# Altium PCB PCB1.pcbdoc
Units mil, origin at the board's own origin, x right, y up, seen from the top; angles counter-clockwise.
Board outline 22891.3 x 3415.4 mil, 2 copper layers (Top Layer, Bottom Layer), stack 62.2 mil thick; 237 components, 120 nets, 553 pads, 0 vias.
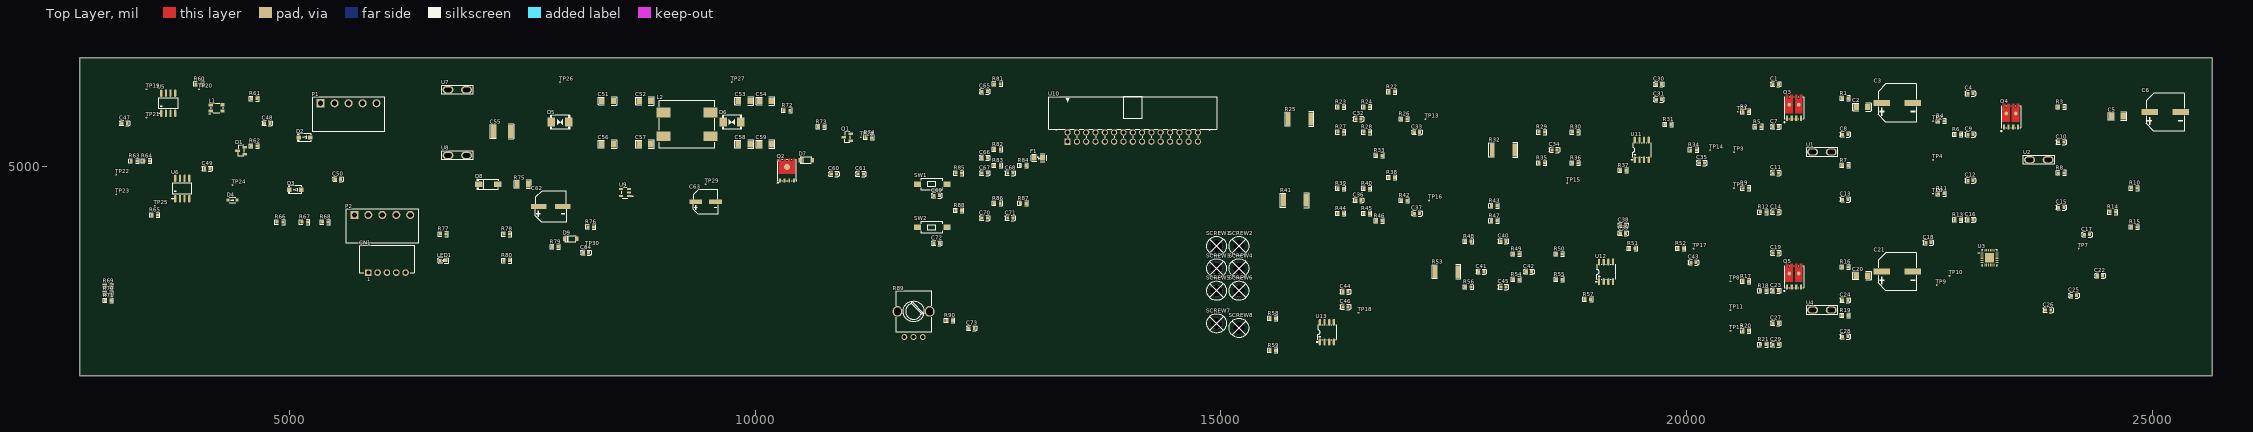
[diagram p0: Top Layer view]
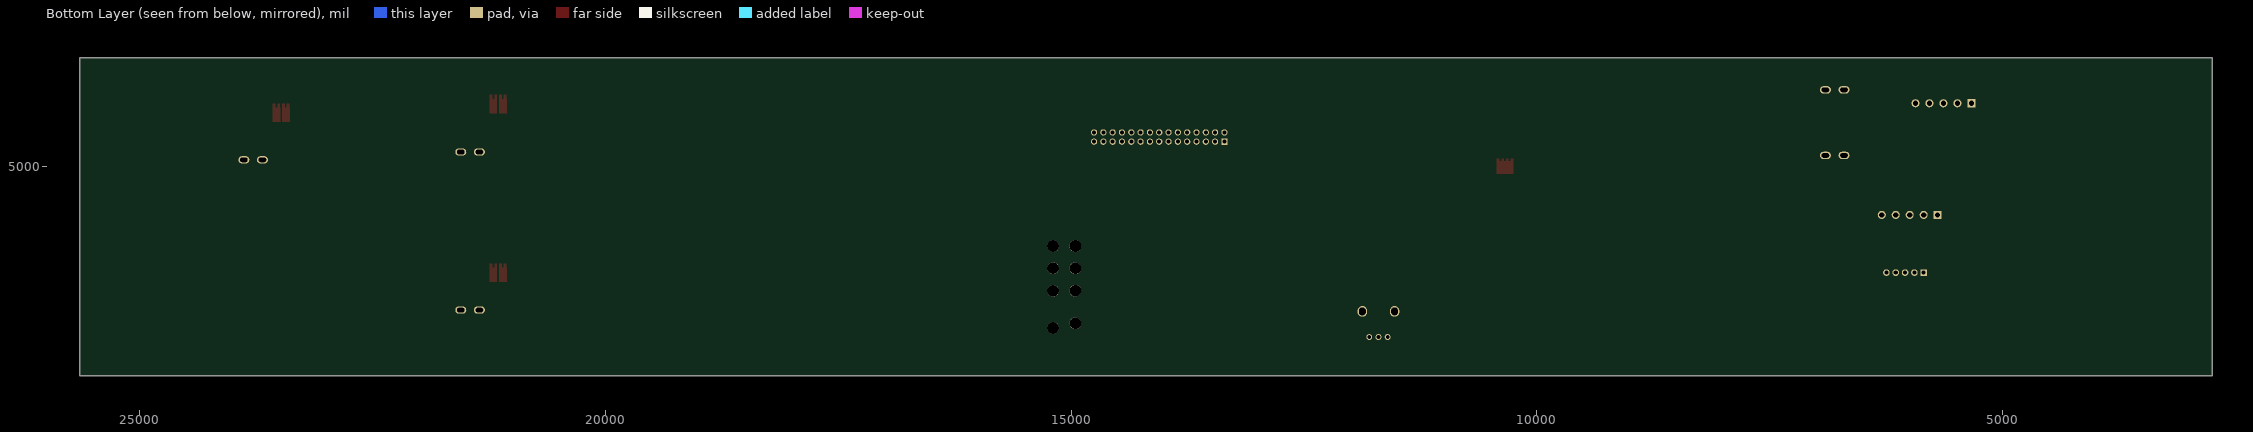
[diagram p1: Bottom Layer view, seen from below]

## Layer stack, top to bottom
Top Solder Mask Layer: solder mask 0.4, Dk 3.3
Top Layer: signal copper 1.4
Dielectric1: surface 59.4, FR4, Dk 4.5
Bottom Layer: signal copper 1.4
Bottom Solder Mask Layer: solder mask 0.4, Dk 3.3

## Board outline
25641.3,2750 2750,2750 2750,6165.4 25641.3,6165.4

## Design rules (kind name [scope] priority, off if disabled: settings)
BoardOutlineClearance copperThickness1oz [All] p0: genericclearance=10 ignorepadtopadclearanceinfootprint=FALSE except(0: Arc-SplitContinuation Track-SplitContinuation SMDPad-SplitContinuation THPad-SplitContinuation Via-SplitContinuation Fill-SplitContinuation Poly-SplitContinuation Region-SplitContinuation Text-SplitContinuation)
BoardOutlineClearance copperThickness2oz [All] p0: genericclearance=10 ignorepadtopadclearanceinfootprint=FALSE except(0: Arc-SplitContinuation Track-SplitContinuation SMDPad-SplitContinuation THPad-SplitContinuation Via-SplitContinuation Fill-SplitContinuation Poly-SplitContinuation Region-SplitContinuation Text-SplitContinuation)
BoardOutlineClearance otherClearance [All] p0: genericclearance=10 ignorepadtopadclearanceinfootprint=FALSE except(0: Arc-SplitContinuation Track-SplitContinuation SMDPad-SplitContinuation THPad-SplitContinuation Via-SplitContinuation Fill-SplitContinuation Poly-SplitContinuation Region-SplitContinuation Text-SplitContinuation)
Clearance copperThickness1oz [All] p1: gap=7 ignorepadtopadclearanceinfootprint=FALSE
Clearance copperThickness2oz [All] p1: gap=7 ignorepadtopadclearanceinfootprint=FALSE
Clearance otherClearance [All] p1: gap=7 ignorepadtopadclearanceinfootprint=FALSE
DiffPairsRouting differentialPair [All] p1: maxuncoupledlength=10 minlimit=6 maxlimit=Infinity mostfreqgap=6 toplayer_minwidth=5 toplayer_prefwidth=10 toplayer_maxwidth=100 bottomlayer_minwidth=5 bottomlayer_prefwidth=10 bottomlayer_maxwidth=100
PasteMaskExpansion pasteMaskExpansion [All] p1: expansion=0
PlaneConnect innerPlane [All] p1: planeconnectstyle=Relief reliefexpansion=20 reliefentries=4 reliefconductorwidth=10 reliefairgap=10
PolygonConnect copperRegion [All] p1: connectstyle=Relief reliefentries=4 reliefconductorwidth=10 polygonreliefangle="90 Angle" airgapwidth=10
RoutingVias viaSize [All] p1: viastyle="Through Hole" holewidth=12.0078 minholewidth=11.811 maxholewidth=248.0314 width=12.0078 minwidth=11.811 maxwidth=248.0314
SolderMaskExpansion solderMaskExpansion [IsVia] p1: useseparateexpansions=TRUE expansion=-1000 expansionbottom=-1000
SolderMaskExpansion solderMaskExpansion [All] p2: useseparateexpansions=TRUE expansion=2 expansionbottom=2
Width copperThickness1oz [All] p1: maxlimit=100 minlimit=5 preferedwidth=10
Width copperThickness2oz [All] p1: maxlimit=100 minlimit=8 preferedwidth=10

## Components (designator, comment, footprint, x,y, rotation, side; value= is the part's Value field where it differs from the comment)
C1 "100nF" C0603#1 20957.4,5882.2 r0 top
C2 "100nF" C1206 21883.5,5637.5 r0 top
C3 "220uF" CAP-SMD_BD10.0-L10.3-W10.3-LS11.7-FD#1 22261.1,5682.2 r0 top
C4 "100nF" C0603#2 23046.1,5782.2 r0 top
C5 "100nF" C1206 24625,5537.5 r0 top
C6 "220uF" CAP-SMD_BD10.0-L10.3-W10.3-LS11.7-FD#2 25137.3,5582.2 r0 top
C7 "100nF" C0603#1 20957.4,5424.8 r0 top
C8 "100nF" C0603#2 21702.4,5343 r0 top
C9 "100nF" C0603#2 23046.1,5343 r0 top
C10 "100nF" C0603#3 24020.9,5261.1 r0 top
C11 "100nF" C0603#1 20957.4,4930.1 r0 top
C12 "100nF" C0603#2 23046.1,4848.3 r0 top
C13 "100nF" C0603#2 21702.4,4645.4 r0 top
C14 "100nF" C0603#1 20957.4,4509.6 r0 top
C15 "100nF" C0603#3 24020.9,4559.6 r0 top
C16 "100nF" C0603#2 23046.1,4427.7 r0 top
C17 "100nF" C0603#2 24298.4,4268.2 r0 top
C18 "100nF" C0603#3 22595,4182.4 r0 top
C19 "100nF" C0603#1 20957.4,4069.9 r0 top
C20 "100nF" C1206 21883.5,3825.2 r0 top
C21 "220uF" CAP-SMD_BD10.0-L10.3-W10.3-LS11.7-FD#1 22261.1,3869.9 r0 top
C22 "100nF" C0603#1 24438.1,3825.2 r0 top
C23 "100nF" C0603#1 20957.4,3664.6 r0 top
C24 "100nF" C0603#2 21702.4,3564.6 r0 top
C25 "100nF" C0603#1 24158.5,3614.6 r0 top
C26 "100nF" C0603#1 23881.2,3457.7 r0 top
C27 "100nF" C0603#1 20957.4,3317.3 r0 top
C28 "100nF" C0603#2 21702.4,3173 r0 top
C29 "100nF" C0603#1 20957.4,3087.2 r0 top
C30 "100nF" C0603#2 19701.4,5882.2 r0 top
C31 "100nF" C0603#2 19701.4,5718.7 r0 top
C32 "100nF" C0603#1 16477.3,5508.4 r0 top
C33 "100nF" C0603#2 17106.2,5368 r0 top
C34 "100nF" C0603#2 18581.4,5177 r0 top
C35 "100nF" C0603#3 20163.5,5036.6 r0 top
C36 "100nF" C0603#1 16477.3,4635.4 r0 top
C37 "100nF" C0603#2 17106.2,4495 r0 top
C38 "100nF" C0603#3 19317.9,4367.3 r0 top
C39 "100nF" C0603#3 19317.9,4281.5 r0 top
C40 "100nF" C0603#2 18032.4,4195.7 r0 top
C41 "100nF" C0603#1 17795,3868.4 r0 top
C42 "100nF" C0603#2 18306.9,3868.4 r0 top
C43 "100nF" C0603#2 20073.7,3968.4 r0 top
C44 "100nF" C0603#2 16337.6,3654.9 r0 top
C45 "100nF" C0603#2 18032.4,3704.9 r0 top
C46 "100nF" C0603#2 16337.6,3491.4 r0 top
C47 "100nF" C0603#2 3231.5,5462.7 r0 top
C48 "100nF" C0603#3 4761.6,5462.7 r0 top
C49 "100nF" C0603#3 4118.5,4975.9 r0 top
C50 "100nF" C0603#2 5522.3,4863.4 r0 top
C51 "100nF" C1206 8416.2,5701.9 r0 top
C52 "100nF" C1206 8817.4,5701.9 r0 top
C53 "100nF" C1206 9882.3,5701.9 r0 top
C54 "100nF" C1206 10109.8,5701.9 r0 top
C55 "100uF" C1812 7283.6,5375.2 r0 top
C56 "100nF" C1206 8416.2,5237.9 r0 top
C57 "100nF" C1206 8817.4,5237.9 r0 top
C58 "100nF" C1206 9882.3,5237.9 r0 top
C59 "100nF" C1206 10109.8,5237.9 r0 top
C60 "100nF" C0603#2 10845.4,4918 r0 top
C61 "100nF" C0603#3 11134.1,4918 r0 top
C62 "220uF" CAP-SMD_BD8.0-L8.3-W8.3-FD 7804.8,4569 r0 top
C63 "220uF" CAP-SMD_BD6.3-L6.6-W6.6-LS7.3-FD-H7.7 9467.9,4619 r0 top
C64 "100nF" C0603#3 8185,4074 r0 top
C65 "100nF" C0603#3 12464.2,5804.5 r0 top
C66 "100nF" C0603#3 12464.2,5091.6 r0 top
C67 "100nF" C0603#3 12464.2,4928.1 r0 top
C68 "100nF" C0603#3 12738.7,4928.1 r0 top
C69 "100nF" C0603#2 11950,4686.6 r0 top
C70 "100nF" C0603#3 12464.2,4445.4 r0 top
C71 "100nF" C0603#3 12738.7,4445.4 r0 top
C72 "100nF" C0603#2 11950,4175 r0 top
C73 "100nF" C0603#2 12324.5,3263.8 r0 top
CN1 "XH-5AW" CONN-TH_5P-P2.54_XH-5AW_C2908614 6046.8,3859.9 r0 top
D1 "PESD2CAN" SOT-23-3_L2.9-W1.3-P1.90-LS2.4-BR#1 4481.5,5169.5 r0 top
D2 "1N4007 A7" SOD-123FL_L2.8-W1.8-LS3.7-RD 5162.4,5310.6 r0 top
D3 "1N4007 A7" SOD-123FL_L2.8-W1.8-LS3.7-RD 5062.4,4750.9 r0 top
D4 "PESD1LIN" SOD-323_L1.7-W1.3-LS2.5-BI 4388,4638.2 r0 top
D5 "SMBJ40CA" SMB_L4.6-W3.6-LS5.3-BI#1 7904.8,5475.2 r0 top
D6 "SMBJ40CA" SMB_L4.6-W3.6-LS5.3-BI#2 9748.9,5475.2 r0 top
D7 "BZT52C5V1" SOD-123_L2.7-W1.6-LS3.7-RD 10548.3,5068 r0 top
D8 "ES1J" SMA_L4.4-W2.8-LS5.4-RD 7133.6,4808.6 r0 top
D9 "BAT46W-HE3-08" SOD-123_L2.8-W1.8-LS3.7-RD 8019.7,4223.3 r0 top
F1 "SMD0805-050-6" F0805 13040.9,5091.6 r0 top
L1 "PSCIAQ3225-510Z" FILTER-SMD_4P-L3.2-W2.5-BL_SDCW3225L-2-601TF 4218.5,5627.9 r0 top
L2 "PCAQ1513MW-301" FILTER-SMD_4P-L15.0-W13.0-BL-1 9267.9,5451.9 r0 top
LED1 "" LED_0603 6652.3,3988.9 r0 top
P1 "WJ15EDGRC-3.81-5P" CONN-TH_5P-P3.81_WJ15EDGRC-3.81-5P 5634.7,5677.9 r0 top
P2 "WJ15EDGRC-3.81-5P" CONN-TH_5P-P3.81_WJ15EDGRC-3.81-5P 5996.8,4479.1 r0 top
Q1 "BC847B,215" SOT-23-3_L2.9-W1.3-P1.90-LS2.4-BR#2 10988.8,5313.4 r0 top
Q2 "JMSH0401AGQ" POWERVDFN-8_L6.2-W5.2-P1.27-LS6.0-BL 10341.3,4918 r0 top
Q3 "YJGD20G10B" DFN-8_L5.5-W5.2-P1.27-LS6.0-BL-EP2#1 21152,5582.2 r0 top
Q4 "YJGD20G10B" DFN-8_L5.5-W5.2-P1.27-LS6.0-BL-EP2#1 23481.2,5487.5 r0 top
Q5 "YJGD20G10B" DFN-8_L5.5-W5.2-P1.27-LS6.0-BL-EP2#2 21152,3769.9 r0 top
R1 "10K" R0603#1 21702.4,5732.2 r0 top
R2 "10K" R0603#2 20635.1,5587.5 r0 top
R3 "10K" R0603#3 24020.9,5637.5 r0 top
R4 "10K" R0603#2 22734.4,5487.5 r0 top
R5 "10K" R0603#1 20769.9,5424.8 r0 top
R6 "10K" R0603#3 22908.5,5343 r0 top
R7 "10K" R0603#1 21702.4,5012 r0 top
R8 "10K" R0603#3 24020.9,4930.1 r0 top
R9 "10K" R0603#2 20635.1,4766.6 r0 top
R10 "10K" R0603#1 24806.2,4766.6 r0 top
R11 "10K" R0603#2 22734.4,4708.1 r0 top
R12 "10K" R0603#1 20819.9,4509.6 r0 top
R13 "10K" R0603#3 22908.5,4427.7 r0 top
R14 "10K" R0603#3 24575,4509.6 r0 top
R15 "KNTC0603/10KF3950" R0603#1 24806.2,4350 r0 top
R16 "10K" R0603#1 21702.4,3919.9 r0 top
R17 "10K" R0603#2 20635.1,3766.6 r0 top
R18 "10K" R0603#1 20819.9,3664.6 r0 top
R19 "10K" R0603#1 21702.4,3399.2 r0 top
R20 "10K" R0603#2 20635.1,3235.7 r0 top
R21 "10K" R0603#1 20819.9,3087.2 r0 top
R22 "10K" R0603#1 16833.9,5800.6 r0 top
R23 "10K" R0603#1 16287.6,5637.1 r0 top
R24 "10K" R0603#1 16564.4,5637.1 r0 top
R25 "10mΩ" R2512 15842.9,5508.4 r0 top
R26 "10K" R0603#2 16968.6,5508.4 r0 top
R27 "10K" R0603#1 16287.6,5368 r0 top
R28 "10K" R0603#1 16564.4,5368 r0 top
R29 "10K" R0603#3 18443.8,5368 r0 top
R30 "10K" R0603#1 18805.5,5368 r0 top
R31 "10K" R0603#1 19801.4,5449.8 r0 top
R32 "10mΩ" R2512 18032.4,5177 r0 top
R33 "10K" R0603#3 16699.1,5118.4 r0 top
R34 "10K" R0603#1 20073.7,5177 r0 top
R35 "10K" R0603#3 18443.8,5036.6 r0 top
R36 "10K" R0603#1 18805.5,5036.6 r0 top
R37 "10K" R0603#3 19317.9,4958.9 r0 top
R38 "10K" R0603#1 16833.9,4881.2 r0 top
R39 "10K" R0603#1 16287.6,4764.1 r0 top
R40 "10K" R0603#1 16564.4,4764.1 r0 top
R41 "10mΩ" R2512 15792.9,4635.4 r0 top
R42 "10K" R0603#2 16968.6,4635.4 r0 top
R43 "10K" R0603#1 17932.4,4576.8 r0 top
R44 "10K" R0603#1 16287.6,4495 r0 top
R45 "10K" R0603#1 16564.4,4495 r0 top
R46 "10K" R0603#3 16699.1,4417.3 r0 top
R47 "10K" R0603#1 17932.4,4417.3 r0 top
R48 "10K" R0603#1 17657.5,4195.7 r0 top
R49 "10K" R0603#3 18169.3,4059.4 r0 top
R50 "10K" R0603#1 18631.4,4059.4 r0 top
R51 "10K" R0603#3 19417.9,4118 r0 top
R52 "10K" R0603#2 19936.1,4118 r0 top
R53 "10mΩ" R2512 17422.3,3868.4 r0 top
R54 "10K" R0603#3 18169.3,3786.8 r0 top
R55 "10K" R0603#1 18631.4,3786.8 r0 top
R56 "10K" R0603#1 17657.5,3704.9 r0 top
R57 "10K" R0603#3 18940.2,3573.3 r0 top
R58 "10K" R0603#2 15557.7,3370.4 r0 top
R59 "10K" R0603#2 15557.7,3026 r0 top
R60 "10K" R0603#1 4028.7,5886.4 r0 top
R61 "10K" R0603#2 4624.1,5727.9 r0 top
R62 "10K" R0603#2 4624.1,5219.5 r0 top
R63 "10K" R0603#1 3331.5,5057.7 r0 top
R64 "10K" R0603#2 3466.2,5057.7 r0 top
R65 "10K" R0603#1 3553.3,4479.1 r0 top
R66 "10K" R0603#1 4898.6,4401.4 r0 top
R67 "10K" R0603#3 5162.4,4401.4 r0 top
R68 "10K" R0603#3 5384.7,4401.4 r0 top
R69 "10K" R0603#3 3054.5,3716.2 r0 top
R70 "10K" R0603#3 3054.5,3638.5 r0 top
R71 "10K" R0603#3 3054.5,3560.8 r0 top
R72 "10K" R0603#3 10341.3,5601.9 r0 top
R73 "10K" R0603#3 10707.8,5425.2 r0 top
R74 "10K" R0603#2 11221.2,5313.4 r0 top
R75 "10K" R1206 7504.8,4808.6 r0 top
R76 "10K" R0603#3 8235,4351 r0 top
R77 "10K" R0603#2 6652.3,4273.3 r0 top
R78 "10K" R0603#3 7333.6,4273.3 r0 top
R79 "10K" R0603#3 7854.8,4136.7 r0 top
R80 "10K" R0603#3 7333.6,3988.9 r0 top
R81 "10K" R0603#1 12601.2,5886.4 r0 top
R82 "10K" R0603#1 12601.2,5183.3 r0 top
R83 "10K" R0603#1 12601.2,5009.9 r0 top
R84 "10K" R0603#1 12875.7,5009.9 r0 top
R85 "10K" R0603#3 12186.9,4928.1 r0 top
R86 "10K" R0603#1 12601.2,4604.9 r0 top
R87 "10K" R0603#1 12875.7,4604.9 r0 top
R88 "10K" R0603#3 12186.9,4527.2 r0 top
R89 "R09022N0-FB20B7.0-B503-000" RES-ADJ-TH_R09022N0-FB20B7B503-0004 11700,3305.7 r0 top
R90 "10K" R0603#3 12086.9,3345.7 r0 top
SCREW1 "" M3螺丝 14953.6,4145 r0 top
SCREW2 "" M3螺丝 15193.3,4145 r0 top
SCREW3 "" M3螺丝 14953.6,3905.4 r0 top
SCREW4 "" M3螺丝 15193.3,3905.4 r0 top
SCREW5 "" M3螺丝 14953.6,3665.7 r0 top
SCREW6 "" M3螺丝 15193.3,3665.7 r0 top
SCREW7 "" M3螺丝 14953.6,3315.7 r0 top
SCREW8 "" M3螺丝 15193.3,3265.7 r0 top
SW1 "TS-1101-C-W" SW-SMD_L6.0-W3.3-LS8.0 11900,4810.1 r0 top
SW2 "TS-1101-C-W" SW-SMD_L6.0-W3.3-LS8.0 11900,4345.4 r0 top
TP1 "" Test-Point-0.5mm 20548.1,5587.5 r0 top
TP2 "" Test-Point-0.5mm 22645,5487.5 r0 top
TP3 "" Test-Point-0.5mm 20508.7,5154.3 r0 top
TP4 "" Test-Point-0.5mm 22645,5070.5 r0 top
TP5 "" Test-Point-0.5mm 20508.7,4766.6 r0 top
TP6 "" Test-Point-0.5mm 22645,4708.1 r0 top
TP7 "" Test-Point-0.5mm 24208.5,4119.9 r0 top
TP8 "" Test-Point-0.5mm 20469.3,3766.6 r0 top
TP9 "" Test-Point-0.5mm 22684.4,3727.3 r0 top
TP10 "" Test-Point-0.5mm 22821.5,3825.2 r0 top
TP11 "" Test-Point-0.5mm 20469.3,3457.7 r0 top
TP12 "" Test-Point-0.5mm 20469.3,3235.7 r0 top
TP13 "" Test-Point-0.5mm 17195.4,5508.4 r0 top
TP14 "" Test-Point-0.5mm 20252.8,5177 r0 top
TP15 "" Test-Point-0.5mm 18718.4,4822.6 r0 top
TP16 "" Test-Point-0.5mm 17234.8,4635.4 r0 top
TP17 "" Test-Point-0.5mm 20073.7,4118 r0 top
TP18 "" Test-Point-0.5mm 16477.3,3428.9 r0 top
TP19 "" Test-Point-0.5mm 3466.2,5827.9 r0 top
TP20 "" Test-Point-0.5mm 4028.7,5827.9 r0 top
TP21 "" Test-Point-0.5mm 3466.2,5525.4 r0 top
TP22 "" Test-Point-0.5mm 3141.6,4913.4 r0 top
TP23 "" Test-Point-0.5mm 3141.6,4700.9 r0 top
TP24 "" Test-Point-0.5mm 4388,4800.9 r0 top
TP25 "" Test-Point-0.5mm 3553.3,4576.7 r0 top
TP26 "" Test-Point-0.5mm 7904.8,5905.6 r0 top
TP27 "" Test-Point-0.5mm 9748.9,5905.6 r0 top
TP28 "" Test-Point-0.5mm 11134.1,5313.4 r0 top
TP29 "" Test-Point-0.5mm 9467.9,4808.6 r0 top
TP30 "" Test-Point-0.5mm 8185,4136.7 r0 top
U1 "EST026" CONN-TH_L6.3-W0.8-EST026 21452,5154.3 r0 top
U2 "EST026" CONN-TH_L6.3-W0.8-EST026 23781.2,5070.5 r0 top
U3 "" QFN24_L4.0-W4.0-P0.5-TL-EP2.45 23250.3,4019.9 r0 top
U4 "EST026" CONN-TH_L6.3-W0.8-EST026 21452,3457.7 r0 top
U5 "TJA1044GTJ" SOIC-8_L4.9-W3.9-P1.27-LS6.0-BL 3699,5677.9 r0 top
U6 "TJA1021T/20/CM,118" SOIC-8_L4.9-W3.9-P1.27-LS6.0-BL 3849,4763.4 r0 top
U7 "EST026" CONN-TH_L6.3-W0.8-EST026 6802.3,5821.8 r0 top
U8 "EST026" CONN-TH_L6.3-W0.8-EST026 6802.3,5118 r0 top
U9 "ICW1235C50M5GQ1" SOT-23-5_L2.9-W1.6-P0.95-LS2.8-BR 8602.8,4719 r0 top
U10 "XDFH-0259-2*15P" CONN-TH_30P-P2.54_LX_XDFH-0259-2X15P 14053.6,5315.4 r0 top
U11 "TP2412-SR" SOP-8_L4.9-W3.9-P1.27-LS6.0-BL 19517.9,5177 r0 top
U12 "TP2412-SR" SOP-8_L4.9-W3.9-P1.27-LS6.0-BL 19134.5,3868.4 r0 top
U13 "TP2412-SR" SOP-8_L4.9-W3.9-P1.27-LS6.0-BL 16137.6,3220.4 r0 top

## Footprints (in the part's own frame and the unit in brackets; to place one, negate y for a bottom-side part, rotate by r counter-clockwise, add the part's x,y. Pads: shape width x height; smd on the part's side, far side on the other; paste and mask are expansions set on the pad)
C0603#1 [mil]
  rect 31.5x35.4 smd: 1(-27.6,0) 2(27.6,0)
  silkscreen extent -55,-28 55,28
C0603#2 [mil]
  rect 31.5x35.4 smd: 1(-27.6,0) 2(27.5,0)
  silkscreen extent -55,-28 55,28
C0603#3 [mil]
  rect 31.5x35.4 smd: 1(-27.5,0) 2(27.6,0)
  silkscreen extent -55,-28 55,28
C1206 [mil]
  rect 58.5x68 smd paste-3937 mask+2: 1(-62.7,0) 2(62.7,0)
  silkscreen extent -101,-43 101,43
C1812 [mil]
  rect 58.5x136.1 smd paste-3937 mask+2: 1(-90.2,0) 2(90.3,0)
  silkscreen extent -128,-77 128,77
CAP-SMD_BD6.3-L6.6-W6.6-LS7.3-FD-H7.7 [mil]
  rect 137.8x47.2 smd: 1(-105.2,0) 2(105.1,0)
  silkscreen extent -133,-133 133,133
CAP-SMD_BD8.0-L8.3-W8.3-FD [mil]
  rect 165.4x55.1 smd: 1(-128.6,0) 2(128.7,0)
  silkscreen extent -165,-166 165,166
CAP-SMD_BD10.0-L10.3-W10.3-LS11.7-FD#1 [mil]
  rect 177.2x65 smd: 1(-165.4,0) 2(165.3,0)
  silkscreen extent -206,-206 206,206
CAP-SMD_BD10.0-L10.3-W10.3-LS11.7-FD#2 [mil]
  rect 177.2x65 smd: 1(-165.3,0) 2(165.4,0)
  silkscreen extent -206,-206 206,206
CONN-TH_5P-P2.54_XH-5AW_C2908614 [mil]
  rect 70.9x70.9 hole 43.3 paste+0 mask+2: 1(-200,0)
  round 70.9 hole 43.3 paste+0 mask+2: 2(-100,0) 3(0,0) 4(100,0) 5(200,0)
  silkscreen extent -295,0 295,291
CONN-TH_5P-P3.81_WJ15EDGRC-3.81-5P [mil]
  rect 86.6x86.6 hole 55.1: 1(-300,0)
  round 86.6 hole 55.1: 2(-150,0) 3(0,0) 4(150,0) 5(300,0)
  silkscreen extent -390,-300 390,63
CONN-TH_30P-P2.54_LX_XDFH-0259-2X15P [mil]
  rect 66.9x66.9 hole 43.3: 1(-700,-50)
  round 66.9 hole 43.3: 2(-700,50) 3(-600,-50) 4(-600,50) 5(-500,-50) 6(-500,50) 7(-400,-50) 8(-400,50) 9(-300,-50) 10(-300,50) 11(-200,-50) 12(-200,50) 13(-100,-50) 14(-100,50) 15(0,-50) 16(0,50) 17(100,-50) 18(100,50) 19(200,-50) 20(200,50) 21(300,-50) 22(300,50) 23(400,-50) 24(400,50) 25(500,-50) 26(500,50) 27(600,-50) 28(600,50) 29(700,-50) 30(700,50)
  silkscreen extent -900,-7 900,432
CONN-TH_L6.3-W0.8-EST026 [mil]
  oval 118.1x78.7 hole 47.2 slot 78.7 at 0 deg: 1(-100,0) 2(100,0)
  silkscreen extent -165,-49 165,49
DFN-8_L5.5-W5.2-P1.27-LS6.0-BL-EP2#1 [mil]
  rect 24x55 smd: 1(-75,-65.3) 2(-25,-65.3) 3(25,-65.3) 4(75,-65.3)
  round 39.8 smd: 5(51,80.2)
  round 39.7 smd: 6(-51,80.6)
  Top Layer region: 11.2,-10.1 11.2,140.9 12.8,140.9 12.8,184.9 37.3,184.9 37.3,140.9 62.9,140.9 62.9,184.9 87.5,184.9 87.5,140.9 91.1,140.9 91.1,-10.1
  Top Layer region: -91.1,-10.1 -91.1,140.9 -87.6,140.9 -87.6,184.9 -62.5,184.9 -62.5,140.9 -37.9,140.9 -37.9,184.9 -12.3,184.9 -12.3,140.9 -11.3,140.9 -11.3,-10.1
  silkscreen extent -107,-113 105,164
DFN-8_L5.5-W5.2-P1.27-LS6.0-BL-EP2#2 [mil]
  rect 24x55 smd: 1(-75,-65.4) 2(-25,-65.4) 3(25,-65.4) 4(75,-65.4)
  round 39.8 smd: 5(51,80.2)
  round 39.7 smd: 6(-51,80.6)
  Top Layer region: 11.2,-10.1 11.2,140.8 12.8,140.8 12.8,184.9 37.3,184.9 37.3,140.8 62.9,140.8 62.9,184.9 87.5,184.9 87.5,140.8 91.1,140.8 91.1,-10.1
  Top Layer region: -91.1,-10.1 -91.1,140.8 -87.6,140.8 -87.6,184.9 -62.5,184.9 -62.5,140.8 -37.9,140.8 -37.9,184.9 -12.3,184.9 -12.3,140.8 -11.3,140.8 -11.3,-10.1
  silkscreen extent -107,-113 105,164
F0805 [mil]
  rect 52.6x59.1 smd paste-3937 mask+2: 1(-45,0) 2(44.9,0)
  silkscreen extent -85,-40 85,40
FILTER-SMD_4P-L3.2-W2.5-BL_SDCW3225L-2-601TF [mil]
  rect 47.2x35.4 smd: 1(-63,-33.5) 2(63,-33.5) 3(63,33.4) 4(-63,33.4)
  silkscreen extent -80,-70 65,50
FILTER-SMD_4P-L15.0-W13.0-BL-1 [mil]
  rect 149.6x106.3 smd: 1(-252,128) 2(-252,-127.9) 3(251.9,-127.9) 4(251.9,128)
  silkscreen extent -295,-256 295,256
LED_0603 [mil]
  rect 31.5x31.5 smd paste+0 mask+2: 1(-33.5,-0.4) 2(29.5,-0.2)
  silkscreen extent -61,-30 53,30
M3螺丝 [mil]
  round 126 hole 126 paste+0 mask+4: 1(0,0)
  silkscreen extent -105,-105 105,105
POWERVDFN-8_L6.2-W5.2-P1.27-LS6.0-BL [mil]
  rect 19.7x39.4 smd paste-3937 mask+2: 1(-75,-69.9) 2(-25,-69.9) 3(25,-69.9) 4(75,-69.9)
  round 62.5 smd: 5(0,76.2)
  Top Layer region: -86.6,1 -86.6,162.4 -63,162.4 -63,138.8 -35.4,138.8 -35.4,162.4 -15.7,162.4 -15.7,138.8 15.8,138.8 15.8,162.4 35.5,162.4 35.5,138.8 63,138.8 63,162.4 86.7,162.4 86.7,1
  silkscreen extent -103,-99 100,151
QFN24_L4.0-W4.0-P0.5-TL-EP2.45 [mil]
  rect 32x10 smd paste+0 mask+2: 1(-80,49.2) 2(-80,29.5) 3(-80,9.8) 4(-80,-9.8) 5(-80,-29.5) 6(-80,-49.2) 13(80,-49.2) 14(80,-29.5) 15(80,-9.8) 16(80,9.8) 17(80,29.5) 18(80,49.2)
  rect 10x32 smd paste+0 mask+2: 7(-49.2,-80) 8(-29.5,-80) 9(-9.8,-80) 10(9.9,-80) 11(29.6,-80) 12(49.2,-80) 19(49.2,80) 20(29.6,80) 21(9.9,80) 22(-9.8,80) 23(-29.5,80) 24(-49.2,80)
  rect 100x100 smd paste+0 mask+2: 25(0,0)
  silkscreen extent -118,-85 85,85
R0603#1 [mil]
  rect 31.8x34 smd paste-3937 mask+2: 1(-29.7,0) 2(29.6,0)
  silkscreen extent -54,-26 54,26
R0603#2 [mil]
  rect 31.8x34 smd paste-3937 mask+2: 1(-29.7,0) 2(29.7,0)
  silkscreen extent -54,-26 54,26
R0603#3 [mil]
  rect 31.8x34 smd paste-3937 mask+2: 1(-29.6,0) 2(29.7,0)
  silkscreen extent -54,-26 55,26
R1206 [mil]
  rect 47.5x67 smd paste-3937 mask+2: 1(-58.2,0) 2(58.2,0)
  silkscreen extent -91,-42 91,42
R2512 [mil]
  rect 50.5x136.1 smd paste-3937 mask+2: 1(-120.7,0) 2(120.7,0)
  silkscreen extent -155,-77 155,77
RES-ADJ-TH_R09022N0-FB20B7B503-0004 [mil]
  round 63 hole 39.4: 1(-98.4,-137.8) 2(0,-137.8) 3(98.4,-137.8)
  oval 102.4x114.2 hole 70.9 slot 82.7 at 90 deg: 4(173.2,137.8) 5(-173.2,137.8)
  silkscreen extent -193,-79 193,354
SMA_L4.4-W2.8-LS5.4-RD [mil]
  rect 80.6x63.8 smd: 1(-101,0) 2(101,0)
  silkscreen extent -121,-57 106,57
SMB_L4.6-W3.6-LS5.3-BI#1 [mil]
  rect 80.6x94.5 smd: 1(-94.1,0) 2(94.2,0)
  silkscreen extent -105,-75 108,75
SMB_L4.6-W3.6-LS5.3-BI#2 [mil]
  rect 80.6x94.5 smd: 1(-94.2,0) 2(94.1,0)
  silkscreen extent -105,-75 108,75
SOD-123_L2.7-W1.6-LS3.7-RD [mil]
  rect 35.8x48 smd: 1(-64.4,0) 2(64.4,0)
  silkscreen extent -63,-40 54,40
SOD-123_L2.8-W1.8-LS3.7-RD [mil]
  rect 37.4x45.3 smd: 1(-66.6,0) 2(66.6,0)
  silkscreen extent -62,-34 55,34
SOD-123FL_L2.8-W1.8-LS3.7-RD [mil]
  rect 47.2x47.2 smd: 1(-63,0) 2(63,0)
  silkscreen extent -75,-39 71,39
SOD-323_L1.7-W1.3-LS2.5-BI [mil]
  rect 31.5x31.5 smd: 1(-47.4,0) 2(47.5,0)
  silkscreen extent -34,-27 33,28
SOIC-8_L4.9-W3.9-P1.27-LS6.0-BL [mil]
  oval 23.1x80.5 smd: 1(-75,-109.2) 2(-25,-109.2) 3(25,-109.2) 4(75,-109.2) 5(75,109.1) 6(25,109.1) 7(-25,109.1) 8(-75,109.1)
  silkscreen extent -110,-115 99,60
SOP-8_L4.9-W3.9-P1.27-LS6.0-BL [mil]
  oval 24.8x73.4 smd: 1(-75,-105.6) 2(-25,-105.6) 3(25,-105.6) 4(75,-105.6) 5(75,105.6) 6(25,105.6) 7(-25,105.6) 8(-75,105.6)
  silkscreen extent -111,-112 98,79
SOT-23-3_L2.9-W1.3-P1.90-LS2.4-BR#1 [mil]
  rect 49.2x27.6 smd: 1(39.4,-37.4) 2(39.4,37.4) 3(-39.3,0)
  silkscreen extent -29,-60 29,60
SOT-23-3_L2.9-W1.3-P1.90-LS2.4-BR#2 [mil]
  rect 49.2x27.6 smd: 1(39.3,-37.4) 2(39.3,37.4) 3(-39.4,0)
  silkscreen extent -29,-60 28,60
SOT-23-5_L2.9-W1.6-P0.95-LS2.8-BR [mil]
  rect 39.4x23.6 smd paste+0 mask+2: 1(43.3,-37.4) 2(43.3,0) 3(43.3,37.4) 4(-43.3,37.4) 5(-43.3,-37.4)
  silkscreen extent -35,-60 85,55
SW-SMD_L6.0-W3.3-LS8.0 [mil]
  rect 74.8x59.1 smd: 1(-157.5,0) 2(157.5,0)
  silkscreen extent -124,-66 113,64
Test-Point-0.5mm [mil]
  round 19.7 smd: 1(0,0)

## Nets (pads, with @x,y where several pads share a name; then routed paths per layer and width w, separated by ;. In a path a pad name is that pad's centre, name@x,y a point inside that pad or via, vN(x,y) a via of type N, cw(c..) or ccw(c..) an arc to the next point about the centre after c; other vN are vias at no path point)
2V5: R33.1 R37.1 R46.1 TP18.1 U13.1 U13.2
2V5_1: R57.1 TP15.1 U12.6 U12.7
5V: C30.2 C31.2 C38.2 C39.2 C44.2 C46.2 C47.2 C63.1 D3.2 D9.1 F1.1 R10.1 R43.2 R58.2 R63.1 R64.1 R65.2 R66.2 R67.2 R68.2 R85.2 R88.2 R89.1 TP29.1 U5.3 U9.5 U11.8 U12.8 U13.8
12V: C18.1 C62.1 R75.2 R76.2 U3.4 U9.1
$1N2750: C4.1 C9.2 Q4.2 R4.1 R6.2
$1N2751: C12.1 C16.2 Q4.4 R11.1 R13.2
$1N2760: C1.1 C7.2 Q3.2 R2.1 R5.2
$1N2761: C11.1 C14.2 Q3.4 R9.1 R12.2
$1N2770: C19.1 C23.2 Q5.2 R17.1 R18.2
$1N2771: C27.1 C29.2 Q5.4 R20.1 R21.2
$1N2783: C22.2 U3.20
$1N2785: C25.2 U3.17
$1N2787: C26.2 U3.14
$1N10342: R10.2 R14.1 R15.1
$1N10503: TP7.1 U3.21
$1N10524: TP10.1 U3.7
$1N10545: TP9.1 U3.8
$1N14018: C8.2 R1.2
$1N14105: C13.2 R7.2
$1N14245: C28.2 R19.2
$1N14252: C24.2 R16.2
$1N14389: C15.2 R8.2
$1N14396: C10.2 R3.2
$2N1757: R58.1 R59.2 U13.3
$2N1759: C32.1 R23.2 R24.1
$2N1760: C32.2 R27.2 R28.1
$2N1761: R28.2 R33.2 U13.5
$2N1762: R22.2 R24.2 U13.6
$2N1768: R22.1 R26.2 U13.7
$2N1769: C36.1 R39.2 R40.1
$2N1770: C36.2 R44.2 R45.1
$2N1775: R45.2 R46.2 U11.5
$2N1777: R38.2 R40.2 U11.6
$2N1778: C34.1 R29.2 R30.1
$2N1779: C34.2 R35.2 R36.1
$2N1784: R30.2 R31.2 U11.2
$2N1785: R36.2 R37.2 U11.3
$2N1787: C42.1 R49.2 R50.1
$2N1788: C42.2 R54.2 R55.1
$2N1789: C40.1 C41.2 R48.1 R49.1
$2N1791: C41.1 C45.1 R54.1 R56.1
$2N1793: R50.2 R51.2 U12.2
$2N1794: R55.2 R57.2 U12.3
$2N1796: R51.1 R52.2 U12.1
$2N1797: R38.1 R42.2 U11.7
$2N1800: R31.1 R34.2 U11.1
$2N8532: R43.1 R47.2 U12.5
$3N718: R60.2 TP20.1 U5.8
$3N719: C48.2 R61.2 R62.1
$3N723: L1.1 U5.7
$3N724: L1.4 U5.6
$3N728: R65.1 TP25.1 U6.2
$3N989: D2.1 P1.5
$3N6022: C50.1 CN1.5 D3.1 P2.1
$4N726: C51.1 C56.2
$4N727: C52.1 C57.2
$4N728: C54.1 C59.2
$4N733: C60.2 D7.1 Q2.4 R72.1 R73.2
$4N735: C61.2 Q1.1 R74.2 TP28.1
$4N736: Q1.3 R73.1
$4N923: R78.1 R79.2 R80.2
$4N2754: LED1.2 R77.2
$4N3161: D8.1 R75.1
$4N5208: R76.1 U9.3
$5N238: U10.13
$5N256: F1.2 U10.27 U10.29
$5N1430: R89.2 R90.2
CAN_RX: TP21.1 U5.4 U10.30
CAN_TX: TP19.1 U5.1 U10.28
EGND: C53.1 C58.2
GH1: R2.2 TP1.1 U3.19
GH2: R4.2 TP2.1 U3.16
GH3: R17.2 TP8.1 U3.13
GL1: R9.2 TP5.1 U3.11
GL2: R11.2 TP6.1 U3.10
GL3: R20.2 TP12.1 U3.9
GND: C2.1 C3.2 C5.1 C6.2 C17.1 C18.2 C20.1 C21.2 C30.1 C31.1 C33.2 C35.2 C37.2 C38.1 C39.1 C40.2 C43.2 C44.1 C45.2 C46.1 C47.1 C48.1 C49.2 C50.2 C60.1 C61.1 C62.2 C63.2 C64.1 C65.2 C66.2 C67.2 C68.2 C69.2 C70.2 C71.2 C72.2 C73.2 CN1.1 D1.3 D4.1 D7.2 LED1.1 P1.4 P2.2 Q1.2 Q2.1 Q2.2 Q2.3 R15.2 R47.1 R53.1 R56.2 R59.1 R60.1 R80.1 R89.3 R89.4 R89.5 SW1.1 SW2.1 U3.5 U3.25 U5.2 U6.5 U9.2 U10.23 U10.25 U11.4 U12.4 U13.4
GNDSL: R25.1 R27.1 R32.1 R35.1 R41.1 R44.1 R48.2 R53.2 U3.6
GNDSL1: C13.1 C14.1 Q3.3 R12.1 R23.1 R25.2
GNDSL2: C15.1 C16.1 Q4.3 R13.1 R29.1 R32.2
GNDSL3: C28.1 C29.1 Q5.3 R21.1 R39.1 R41.2
HU: CN1.2 P2.3 R68.1 U10.7
HV: CN1.3 P2.4 R67.1 U10.9
HW: CN1.4 P2.5 R66.1 U10.11
IBUS: C43.1 R52.1 TP17.1 U10.14
IU: C33.1 R26.1 TP13.1 U10.8
IV: C35.1 R34.1 TP14.1 U10.10
IW: C37.1 R42.1 TP16.1 U10.12
PCANH: D1.1 L1.2 P1.1 R61.1
PCANL: D1.2 L1.3 P1.2 R62.2
PLIN: D4.2 P1.3 TP24.1 U6.6
PU: R69.1 U10.18
PV: R70.1 U10.20
PW: R71.1 U10.22
SH1: C7.1 C8.1 C11.2 C22.1 Q3.1 Q3.5 R5.1 R7.1 R69.2 TP3.1 U1.1 U1.2 U3.18
SH2: C9.1 C10.1 C12.2 C25.1 Q4.1 Q4.5 R6.1 R8.1 R70.2 TP4.1 U2.1 U2.2 U3.15
SH3: C23.1 C24.1 C26.1 C27.2 Q5.1 Q5.5 R18.1 R19.1 R71.2 TP11.1 U3.12 U4.1 U4.2
SPIN: C73.1 R90.1 U10.24
START: C69.1 R85.1 SW1.2 U10.15
STOP: C72.1 R88.1 SW2.2 U10.17
TEMP: C17.2 R14.2 U10.26
UART_RX: R63.2 TP22.1 U6.1 U10.21
UART_TX: R64.2 TP23.1 U6.4 U10.19
UN: R82.1 U3.1
UNP: C66.1 R82.2 U10.2
UP: R81.1 U3.22
UPP: C65.1 R81.2 U10.1
VBAT: C1.2 C2.2 C3.1 C4.2 C5.2 C6.1 C19.2 C20.2 C21.1 C49.1 C53.2 C54.2 D2.2 D6.2 D8.2 L2.4 Q3.6 Q4.6 Q5.6 R1.1 R3.1 R16.1 R72.2 R77.1 R78.2 TP27.1 U6.7
VBGND: C58.1 C59.1 D6.1 L2.3 Q2.5 R74.1
VBUS: C64.2 D9.2 R79.1 TP30.1 U10.16
VGND: C55.1 C56.1 C57.1 D5.1 L2.2 U8.1 U8.2
VIN: C51.2 C52.2 C55.2 D5.2 L2.1 TP26.1 U7.1 U7.2
VN: R86.1 U3.2
VNP: C70.1 R86.2 U10.4
VP: R83.1 U3.23
VPP: C67.1 R83.2 U10.3
WN: R87.1 U3.3
WNP: C71.1 R87.2 U10.6
WP: R84.1 U3.24
WPP: C68.1 R84.2 U10.5
pads on no net: SCREW1.1 SCREW2.1 SCREW3.1 SCREW4.1 SCREW5.1 SCREW6.1 SCREW7.1 SCREW8.1 U5.5 U6.3 U6.8 U9.4

## Text inside footprints (layer, text, board x,y; h text height)
CN1: Top Silkscreen Layer "1" at 5836.8,3764.9 h39.4